# Altium PCB PCB.PcbDoc (part 2 of 2)
Units mm, origin at the board's own origin, x right, y up, seen from the top; angles counter-clockwise.
Board outline 100 x 70 mm, 4 copper layers (Top, Middle_1, Middle 2, Bot), stack 1.541 mm thick; 204 components, 143 nets, 825 pads, 208 vias.
Unrouted connection lines stored in the file: 379.
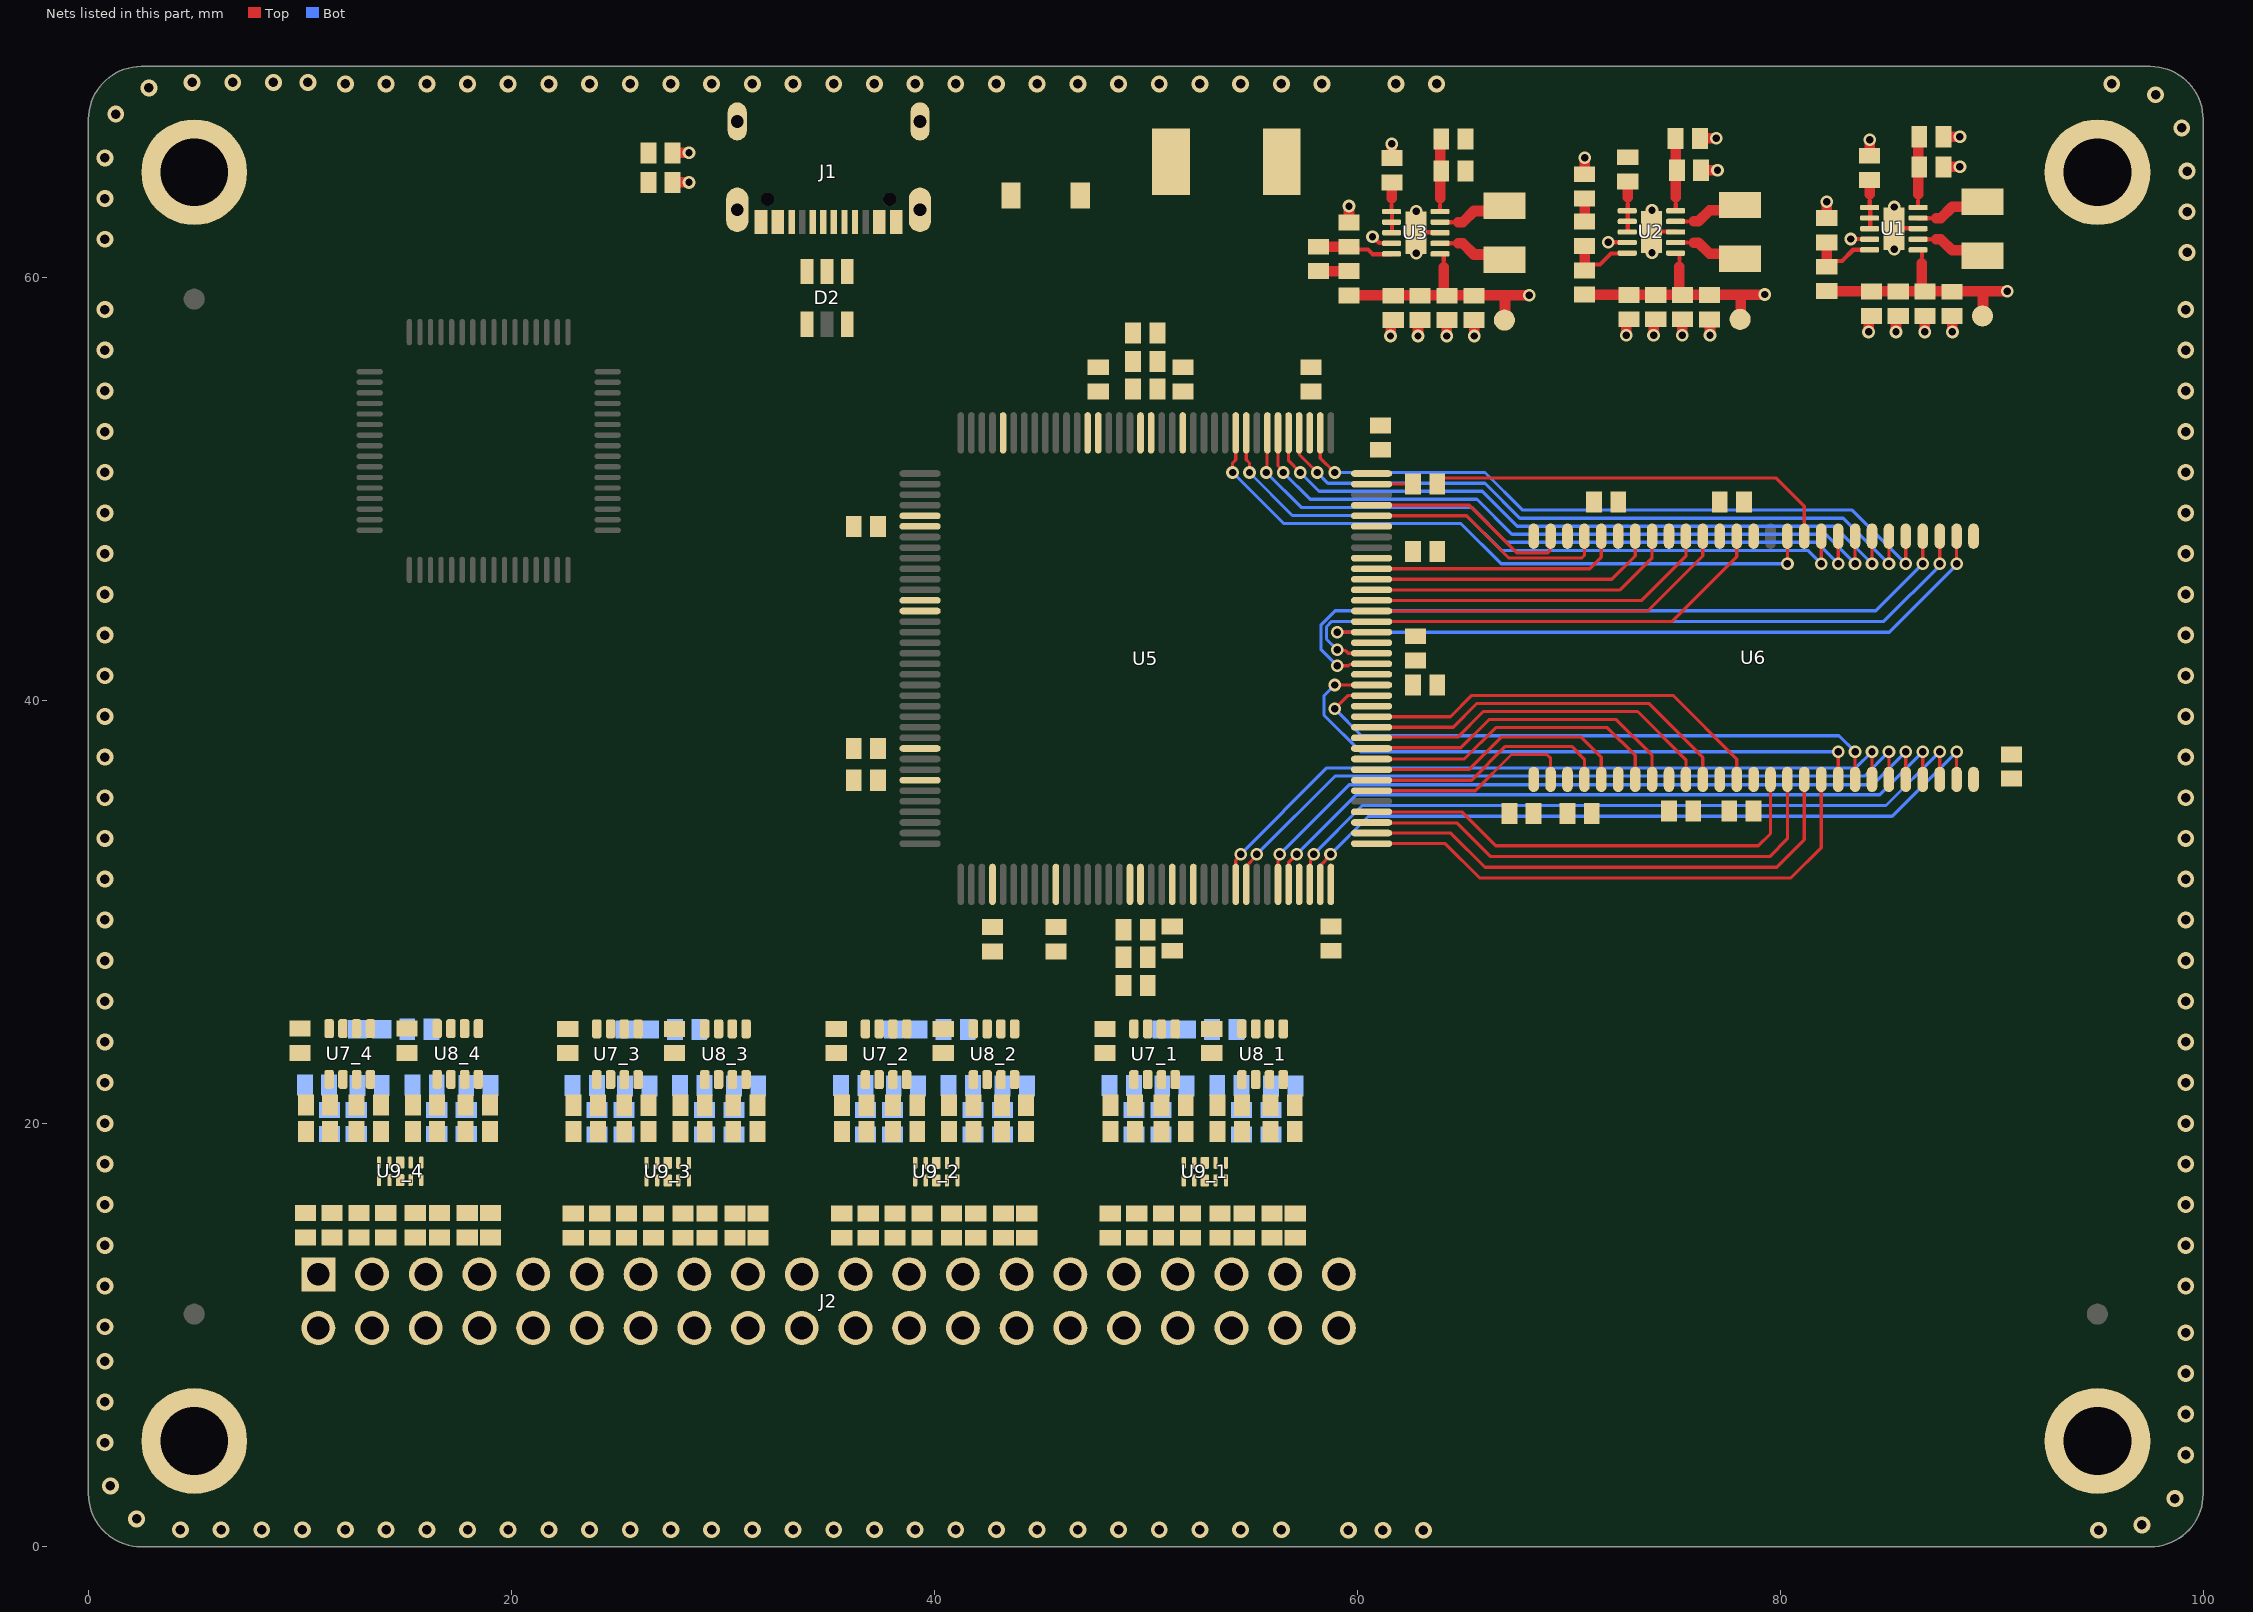
[diagram p4: the nets of this part, all layers, seen from the top]

## Part data
C1 C2 C3 C4 C5 C6 C8 C9 C10 C11 C12 C13 C15 C16 C17 C18 C19 C20 C29 C31: library part CAP-0603-4.7uF-35V-X5R, "Ceramic capacitor 4.7uF 35V X5R 0603", Supplier Part Number 1=490-7205-1-ND, Supplier 1=DigiKey
C7 C14 C21 C22 C23 C24 C25 C26 C27 C28 C30 C32 C33 C34 C35 C36 C37 C38 C39 C40 C41 C42 C43 C44 C45 C46 C48_1 C48_2 C48_3 C48_4 C60_1 C60_2 C60_3 C60_4 C61_1 C61_2 C61_3 C61_4: library part CAP-0603-100nF-50V-X7R, "Ceramic capacitor 100nF 50V X7R 0603", Supplier Part Number 1=490-5798-1-ND, Supplier 1=DigiKey
C47_1 C47_2 C47_3 C47_4 C49_1 C49_2 C49_3 C49_4 C52_1 C52_2 C52_3 C52_4 C59_1 C59_2 C59_3 C59_4: library part CAP-0603-10nF-100V-X7R, "Ceramic capacitor 10nF 100V X7R 0603", Supplier Part Number 1=490-5771-1-ND, Supplier 1=DigiKey
C50_1 C50_2 C50_3 C50_4 C51_1 C51_2 C51_3 C51_4 C53_1 C53_2 C53_3 C53_4 C54_1 C54_2 C54_3 C54_4: library part CAP-0603-10pF-100V-NP0, "Ceramic capacitor 10pF 100V NP0 0603", Supplier Part Number 1=490-4770-1-ND, Supplier 1=DigiKey
C55_1 C55_2 C55_3 C55_4 C56_1 C56_2 C56_3 C56_4 C57_1 C57_2 C57_3 C57_4 C58_1 C58_2 C58_3 C58_4: library part CAP-0603-5pF-100V-NP0, "Ceramic capacitor 5pF 100V NP0 0603", Supplier Part Number 1=490-4770-1-ND, Supplier 1=DigiKey
D1: library part DIO-SOD123W-SCHOTTKY-60V-1A, "Schottky diode 60V 1A SOD-123W", Manufacturer=Nexperia, Supplier Part Number 1=771-PMEG6010CEH-T/R, RoHS Compliant=Yes, Supplier 1=Mouser
D2: library part IC-MPN-USBLC6-2SC6Y, "IC USB ESD protection SOT-23-6", Arrow Part Number=USBLC6-2SC6Y, Manufacturer_Name=STMicroelectronics, Mouser Part Number=511-USBLC6-2SC6Y, Arrow Price/Stock=https://www.arrow.com/en/products/usblc6-2sc6y/stmicroelectronics?utm_currency=USD&region=nac, Datasheet Link=https://componentsearchengine.com/Datasheets/1/USBLC6-2SC6Y.pdf, Height=1.45mm, Manufacturer_Part_Number=USBLC6-2SC6Y, Mouser Price/Stock=https://www.mouser.co.uk/ProductDetail/STMicroelectronics/USBLC6-2SC6Y?qs=gNDSiZmRJS%2FOgDexvXkdow%3D%3D
F1: library part FUS-1812-PTC-1.1A-33V, "33V 1.1A 20A 1.95A 60mΩ 1812 PTC Resettable Fuses ROHS", Manufacturer_Name=LITTELFUSE, Manufacturer_Part_Number=1812L110/33, Mouser Part Number=N/A, Supplier Part Number 1=576-1812L110/33MR, Datasheet Link=http://www.littelfuse.com/~/media/electronics/datasheets/resettable_ptcs/littelfuse_ptc_1812l_datasheet.pdf.pdf, Height=1.25mm, Mouser Price/Stock=https://www.mouser.co.uk/ProductDetail/Littelfuse/1812L110-33?qs=skbisGc1mWUPu8SxwxrL5A%3D%3D, Supplier 1=Mouser
FB1_1 FB1_2 FB1_3 FB1_4: library part FER-0603-120R-3A, "Ferrite Bead, 0603, 75Ω @ 100MHz, 25%, 1Ω, 200mA", Case Code (Imperial)=0603, Case Code (Metric)=1608, Current Rating=3A, DC Resistance (DCR)=30mR, Inductor Type="FERRITE BEAD", Max Operating Temperature=125°C, Min Operating Temperature=-55°C, Package Quantity=4000, Test Frequency=100MHz, Tolerance=25%, Case/Package=0603, Core Material=Ferrite, Depth=0.95mm, Height=0.8mm, Impedance=120R, Lead Free="Lead Free", Length=1.6mm, Material=Ferrite, Max Current Rating=3A, Max DC Current=3A, Number of Circuits=1, Number of Lines=1, Number of Pins=2, Packaging="Tape and Reel", REACH SVHC="No SVHC", RoHS Compliant=Yes, Series=BLM18K, Termination=SMD/SMT, Width=0.8mm
J1: library part CON-MPN-12402012E212A, "USB-C 2.0 connector 24P", Package=None, Supplier Part Number 1=664-12402012E212ACT-ND, Availability="In Stock", Check_prices=https://www.snapeda.com/parts/12402012E212A/Amphenol/view-part/?ref=eda, MF="Amphenol ICC (Commercial Products)", MP=12402012E212A, Price=None, Purchase-URL=https://pricing.snapeda.com/search/part/12402012E212A/?ref=eda, SnapEDA_Link=https://www.snapeda.com/parts/12402012E212A/Amphenol/view-part/?ref=snap, Supplier 1=DigiKey
J2: library part CON-HDR-90DEG-F-2x20-2.54mm, "Female header 2x20 2.54mm THT"
L1 L2 L3: library part IND-1210-1.5uH-1.75A, "1.5 µH Shielded Drum Core, Wirewound Inductor 1.75 A 68.4mOhm Max", Supplier Part Number 1=490-5335-6-ND, Supplier 1=DigiKey
MT1 MT2 MT3 MT4: library part M3_Mounting_Hole, "Mounting Hole 5mm x 5mm for M3 screws"
R1 R2: library part RES-0603-5.1k-1%, "5.1k ±1% 0603 100mW 75V", Manufacturer=UNI-ROYAL, Part Number=0402WGF1001TCE, Supplier Part Number 1=311-5.10KHRCT-ND, Supplier 1=DigiKey
R3 R5: library part RES-0603-560k-1%, "560k ±1% 0603 100mW 75V", Manufacturer=UNI-ROYAL, Part Number=0402WGF1001TCE, Supplier Part Number 1=311-100KHRCT-ND, Supplier 1=DigiKey
R4 R7 R8 R10 R14_1 R14_2 R14_3 R14_4 R15_1 R15_2 R15_3 R15_4 R17_1 R17_2 R17_3 R17_4 R18_1 R18_2 R18_3 R18_4 R20_1 R20_2 R20_3 R20_4 R21_1 R21_2 R21_3 R21_4 R22_1 R22_2 R22_3 R22_4 R23_1 R23_2 R23_3 R23_4: library part RES-0603-100k-1%, "100k ±1% 0603 100mW 75V", Manufacturer=UNI-ROYAL, Part Number=0402WGF1001TCE, Supplier Part Number 1=311-100KHRCT-ND, Supplier 1=DigiKey
R6 R9: library part RES-0603-43.2k-1%, "43.2k ±1% 0603 100mW 75V", Manufacturer=UNI-ROYAL, Part Number=0402WGF1001TCE, Supplier Part Number 1=311-43.2KHRCT-ND, Supplier 1=DigiKey
R11: library part RES-0603-20R-1%, "20R ±1% 0603 100mW 75V", Manufacturer=UNI-ROYAL, Part Number=0402WGF1001TCE, Supplier Part Number 1=13-RC0603FR-1020RLCT-ND, Supplier 1=DigiKey
R12_1 R12_2 R12_3 R12_4 R13_1 R13_2 R13_3 R13_4 R16_1 R16_2 R16_3 R16_4 R19_1 R19_2 R19_3 R19_4 R28 R29: library part RES-0603-100R-1%, "100R ±1% 0603 100mW 75V", Manufacturer=UNI-ROYAL, Part Number=0402WGF1001TCE, Supplier Part Number 1=311-100HRCT-ND, Supplier 1=DigiKey
TP1 TP2 TP3: library part Test_Point_Pad, "Test Point Pad"
U1 U2 U3: library part IC-MPN-TPS63030, "IC buck-boost regulator 900mA TPS63030 SON-10 TPS63031", Datasheet Link=http://www.ti.com/lit/gpn/tps63031
U4: library part IC-MPN-FT2232HL, "Dual High Speed USB to Multipurpose UART / FIFO IC, 3 to 3.6 V, LQFP-64", Manufacturer=FTDI, Maximum Operating Temperature=+85°C, Minimum Operating Temperature=-40°C, Package Description="64-Pin Low-profile Quad Flat Package, Body 10 x 10 mm, Pitch 0.5 mm", Package Reference=LQFP-64, Package Type=LQFP, Datasheet URL=http://www.ftdichip.com/Support/Documents/DataSheets/ICs/DS_FT2232H.pdf, Datasheet Version="Rev. 2.5, 07/2016", Dimensions=10x10x1.4mm, Height=1.4mm, Length=10mm, Manufacturer URL=http://www.nxp.com/, Maximum Data Rate=480Mbit/s, Mounting Technology=SurfaceMount, Mounting Type=SurfaceMount, Number of Channels per Chip=2, Pin Count=64, Standard Supported=RS232,RS422,RS485, Width=10mm
U5: library part IC-MPN-ICE40HX4K-TQ144, "iCE40 HX4K Series FPGA Family, 3520 Logic Cells, 1.2 V Core, 80 K Embedded RAM Bits, TQFP-144", ComponentLink1Description="Manufacturer URL", ComponentLink1URL=http://www.latticesemi.com/en, ComponentLink2Description=Datasheet, ComponentLink2URL=http://www.latticesemi.com/~/media/Documents/DataSheets/iCE/iCE40LPHXFamilyDataSheet.pdf, ComponentLink3Description="Package Specification", ComponentLink3URL=http://www.latticesemi.com/lit/docs/package/pkg.pdf
U6: library part IC-SDRAM-256Mb-JEDEC-TSSOP2, "SDRAM Memory IC 256Mb (16M x 16) Parallel 166MHz 5ns 54-TSOP II"
U7_1 U7_2 U7_3 U7_4 U8_1 U8_2 U8_3 U8_4: library part IC-MPN-TLV3502AIDCNR, ComponentLink2Description=Datasheet, ComponentLink2URL=http://www.ti.com/lit/ds/symlink/tlv3502.pdf
U9_1 U9_2 U9_3 U9_4: library part TVS-MPN-TPD4E05U06, "14V Clamp 2.5A (8/20µs) Ipp Tvs Diode Surface Mount USON-10", ComponentLink2Description=Datasheet, ComponentLink2URL=http://www.ti.com/lit/ds/symlink/tpd4e05u06-q1.pdf

## Free pads (board coordinates)
  round 1 smd mask+0.5: 145(5,11) 145(5,59) 145(95,11)

## Via types
v1: diameter 0.8, hole 0.45, Top to Bot, tented both sides, 136 vias
v2: diameter 0.6, hole 0.35, Top to Bot, tented both sides, 72 vias

## Nets (pads, with @x,y where several pads share a name; then routed paths per layer and width w, separated by ;. In a path a pad name is that pad's centre, name@x,y a point inside that pad or via, vN(x,y) a via of type N, cw(c..) or ccw(c..) an arc to the next point about the centre after c; other vN are vias at no path point)
1V2: C15.2 C16.2 C17.2 C18.2 C42.2 C43.2 C44.2 C45.2 R8.2 R28.1 R29.1 TP3.1 U3.1 U5.27 U5.40 U5.92 U5.111 | length 11.4
  Top w0.2: 64.092,60.826 U3.1@64.092,61.132
  Top w0.5: R8.2@59.607,59.174 61.688,59.174 C18.2@61.702,59.16 ; C18.2@61.647,59.179 C16.2@64.092,59.179 ; C16.2@64.092,59.151 C16.2@64.092,59.179 ; 64.092,60.496 C16.2@64.092,59.179 ; TP3.1@66.983,58.029 66.983,59.179 ; v2(68.132,59.179) 66.983,59.179 ; C16.2@64.092,59.179 66.983,59.179
2V5: C8.2 C9.2 C10.2 C11.2 C46.2 R5.2 TP2.1 U2.1 U5.108 | length 11.4
  Top w0.2: 75.234,60.862 U2.1@75.234,61.168
  Top w0.5: R5.2@70.749,59.21 72.83,59.21 C11.2@72.844,59.196 ; C11.2@72.789,59.215 C9.2@75.234,59.215 ; C9.2@75.234,59.187 C9.2@75.234,59.215 ; 75.234,60.532 C9.2@75.234,59.215 ; TP2.1@78.125,58.065 78.125,59.215 ; v2(79.274,59.215) 78.125,59.215 ; C9.2@75.234,59.215 78.125,59.215
3V3: C1.2 C2.2 C3.2 C4.2 C22.2 C23.2 C24.2 C25.2 C26.2 C27.2 C28.2 C33.2 C34.2 C35.2 C36.2 C37.2 C38.2 C39.2 C40.2 C41.2 FB1_1.1 FB1_2.1 FB1_3.1 FB1_4.1 R3.2 TP1.1 U1.1 U5.6 U5.30 U5.46 U5.57 U5.72 U5.89 U5.100 U5.123 U5.131 U6.1 U6.3 U6.9 U6.14 U6.27 U6.43 U6.49 | length 11.4
  Top w0.2: 86.698,61.018 U1.1@86.698,61.324
  Top w0.5: R3.2@82.199,59.38 82.213,59.366 84.294,59.366 C4.2@84.308,59.352 ; C4.2@84.253,59.371 C2.2@86.698,59.371 ; C2.2@86.698,59.343 C2.2@86.698,59.371 ; 86.698,60.688 C2.2@86.698,59.371 ; TP1.1@89.589,58.221 89.589,59.371 ; v2(90.738,59.371) 89.589,59.371 ; C2.2@86.698,59.371 89.589,59.371
3V3A_1: C48_1.2 C60_1.2 C61_1.2 FB1_1.2 U7_1.8 U8_1.8
3V3A_2: C48_2.2 C60_2.2 C61_2.2 FB1_2.2 U7_2.8 U8_2.8
3V3A_3: C48_3.2 C60_3.2 C61_3.2 FB1_3.2 U7_3.8 U8_3.8
3V3A_4: C48_4.2 C60_4.2 C61_4.2 FB1_4.2 U7_4.8 U8_4.8
GND: C1.1 C2.1 C3.1 C4.1 C5.1 C6.1 C7.1 C8.1 C9.1 C10.1 C11.1 C12.1 C13.1 C14.1 C15.1 C16.1 C17.1 C18.1 C19.1 C20.1 C21.1 C22.1 C23.1 C24.1 C25.1 C26.1 C27.1 C28.1 C33.1 C34.1 C35.1 C36.1 C37.1 C38.1 C39.1 C40.1 C41.1 C42.1 C43.1 C44.1 C45.1 C46.1 C47_1.1 C47_2.1 C47_3.1 C47_4.1 C48_1.1 C48_2.1 C48_3.1 C48_4.1 C49_1.1 C49_2.1 C49_3.1 C49_4.1 C52_1.1 C52_2.1 C52_3.1 C52_4.1 C55_1.1 C55_2.1 C55_3.1 C55_4.1 C56_1.1 C56_2.1 C56_3.1 C56_4.1 C57_1.1 C57_2.1 C57_3.1 C57_4.1 C58_1.1 C58_2.1 C58_3.1 C58_4.1 C59_1.1 C59_2.1 C59_3.1 C59_4.1 C60_1.1 C60_2.1 C60_3.1 C60_4.1 C61_1.1 C61_2.1 C61_3.1 C61_4.1 D2.2 J1.A1_B12 J1.SH J2.2 J2.4 J2.6 J2.8 J2.9 J2.10 J2.12 J2.14 J2.16 J2.18 J2.19 J2.20 J2.22 J2.24 J2.26 J2.28 J2.29 J2.30 J2.32 J2.34 J2.36 J2.38 J2.39 J2.40 MT1.MT MT2.MT MT3.MT MT4.MT R1.1 R2.1 R4.1 R7.1 R10.1 R20_1.1 R20_2.1 R20_3.1 R20_4.1 R21_1.1 R21_2.1 R21_3.1 R21_4.1 R22_1.1 R22_2.1 R22_3.1 R22_4.1 R23_1.1 R23_2.1 R23_3.1 R23_4.1 U1.3 U1.9 U1.11 U2.3 U2.9 U2.11 U3.3 U3.9 U3.11 U5.5 U5.13 U5.14 U5.59 U5.69 U5.86 U5.103 U5.132 U5.140 U6.6 U6.12 U6.28 U6.41 U6.46 U6.52 U6.54 U7_1.5 U7_2.5 U7_3.5 U7_4.5 U8_1.5 U8_2.5 U8_3.5 U8_4.5 U9_1.3 U9_1.8 U9_2.3 U9_2.8 U9_3.3 U9_3.8 U9_4.3 U9_4.8 | length 24
  Top w0.2: v2(60.722,61.949) 60.741,61.949 61.039,61.652 U3.9@61.639,61.652 ; U3.11@62.792,62.16 U3.3@63.937,62.16 ; v2(71.866,61.687) 72.781,61.687 U2.9@72.789,61.696 ; U2.11@73.934,62.196 U2.3@75.079,62.196 ; v2(83.33,61.844) 84.244,61.844 U1.9@84.253,61.852 ; U1.11@85.398,62.352 U1.3@86.543,62.352
  Top w0.5: R2.1@27.626,64.516 v2(28.4,64.516) ; R1.1@27.626,65.913 v2(28.4,65.913) ; R10.1@59.607,62.624 v2(59.607,63.398) ; v2(61.572,57.255) C18.1@61.572,58.029 ; C21.1@61.626,65.669 v2(61.626,66.337) ; v2(62.869,57.255) C17.1@62.869,58.029 ; v2(64.225,57.255) C16.1@64.225,58.029 ; v2(65.536,57.255) C15.1@65.536,58.029 ; R7.1@70.749,64.905 v2(70.749,65.679) ; v2(72.714,57.291) C11.1@72.714,58.065 ; v2(74.011,57.291) C10.1@74.011,58.065 ; v2(75.367,57.291) C9.1@75.367,58.065 ; C12.1@76.205,66.602 v2(76.979,66.602) ; C13.1@76.26,65.095 v2(77.034,65.095) ; v2(76.678,57.291) C8.1@76.678,58.065 ; R4.1@82.199,62.832 v2(82.199,63.606) ; v2(84.178,57.447) C4.1@84.178,58.221 ; C7.1@84.231,65.755 v2(84.231,66.529) ; v2(85.475,57.447) C3.1@85.475,58.221 ; v2(86.831,57.447) C2.1@86.831,58.221 ; C6.1@87.724,65.251 v2(88.498,65.251) ; C5.1@87.724,66.676 v2(88.498,66.676) ; v2(88.142,57.447) C1.1@88.142,58.221
  other v1: 59.575,0.779 61.206,0.779 63.13,0.779 95.054,0.779 4.348,0.803 6.272,0.803 8.196,0.803 10.12,0.803 12.152,0.803 14.076,0.803 16,0.803 17.924,0.803 19.848,0.803 21.773,0.803 23.697,0.803 25.621,0.803 27.545,0.803 29.469,0.803 31.393,0.803 33.317,0.803 35.241,0.803 37.165,0.803 39.09,0.803 41.014,0.803 42.938,0.803 44.862,0.803 46.786,0.803 48.71,0.803 50.634,0.803 52.558,0.803 54.482,0.803 56.407,0.803 97.098,1.036 2.274,1.316 98.663,2.274 1.036,2.881 99.175,4.348 0.779,4.924 99.175,6.272 0.779,6.848 99.175,8.196 0.779,8.773 99.175,10.12 0.779,10.404 0.779,12.328 99.175,12.328 0.779,14.252 99.175,14.252 0.779,16.177 99.175,16.177 0.779,18.101 99.175,18.101 0.779,20.025 99.175,20.025 0.779,21.949 99.175,21.949 0.779,23.873 99.175,23.873 0.779,25.797 99.175,25.797 0.779,27.721 99.175,27.721 0.779,29.645 99.175,29.645 0.779,31.569 99.175,31.569 0.779,33.494 99.175,33.494 0.779,35.418 99.175,35.418 0.779,37.342 99.175,37.342 0.779,39.266 99.175,39.266 0.779,41.19 99.175,41.19 0.779,43.114 99.175,43.114 0.779,45.038 99.175,45.038 0.779,46.962 99.175,46.962 0.779,48.886 99.175,48.886 0.779,50.811 99.175,50.811 0.779,52.735 99.175,52.735 0.779,54.659 99.175,54.659 0.779,56.583 99.175,56.583 0.779,58.507 99.175,58.507 99.245,61.206 0.779,61.828 99.245,63.13 0.779,63.752 99.245,65.054 0.779,65.676 98.988,67.097 1.292,67.75 97.75,68.663 2.857,68.988 12.152,69.175 14.076,69.175 16,69.175 17.924,69.175 19.848,69.175 21.773,69.175 23.697,69.175 25.621,69.175 27.545,69.175 29.469,69.175 31.393,69.175 33.317,69.175 35.241,69.175 37.165,69.175 39.09,69.175 41.014,69.175 42.938,69.175 44.862,69.175 46.786,69.175 48.71,69.175 50.634,69.175 52.558,69.175 54.482,69.175 56.407,69.175 58.331,69.175 61.828,69.175 63.752,69.175 95.676,69.175 4.9,69.245 6.824,69.245 8.748,69.245 10.38,69.245
  other v2: 62.792,61.16 73.934,61.196 85.398,61.352 62.792,63.16 73.934,63.196 85.398,63.352
GND_PLL0: C29.1 C30.1 U5.53
GND_PLL1: C31.1 C32.1 U5.127
ICE_VCCPLL0: C29.2 C30.2 R28.2 U5.54
ICE_VCCPLL1: C31.2 C32.2 R29.2 U5.126
IN_DIV_1_1: C50_1.2 C58_1.2 R14_1.2 R23_1.2 U7_1.1 U9_1.1 U9_1.10
IN_DIV_1_2: C50_2.2 C58_2.2 R14_2.2 R23_2.2 U7_2.1 U9_2.1 U9_2.10
IN_DIV_1_3: C50_3.2 C58_3.2 R14_3.2 R23_3.2 U7_3.1 U9_3.1 U9_3.10
IN_DIV_1_4: C50_4.2 C58_4.2 R14_4.2 R23_4.2 U7_4.1 U9_4.1 U9_4.10
IN_DIV_2_1: C51_1.2 C57_1.2 R15_1.2 R22_1.2 U7_1.3 U9_1.2 U9_1.9
IN_DIV_2_2: C51_2.2 C57_2.2 R15_2.2 R22_2.2 U7_2.3 U9_2.2 U9_2.9
IN_DIV_2_3: C51_3.2 C57_3.2 R15_3.2 R22_3.2 U7_3.3 U9_3.2 U9_3.9
IN_DIV_2_4: C51_4.2 C57_4.2 R15_4.2 R22_4.2 U7_4.3 U9_4.2 U9_4.9
IN_DIV_3_1: C53_1.2 C56_1.2 R17_1.2 R21_1.2 U8_1.1 U9_1.4 U9_1.7
IN_DIV_3_2: C53_2.2 C56_2.2 R17_2.2 R21_2.2 U8_2.1 U9_2.4 U9_2.7
IN_DIV_3_3: C53_3.2 C56_3.2 R17_3.2 R21_3.2 U8_3.1 U9_3.4 U9_3.7
IN_DIV_3_4: C53_4.2 C56_4.2 R17_4.2 R21_4.2 U8_4.1 U9_4.4 U9_4.7
IN_DIV_4_1: C54_1.2 C55_1.2 R18_1.2 R20_1.2 U8_1.3 U9_1.5 U9_1.6
IN_DIV_4_2: C54_2.2 C55_2.2 R18_2.2 R20_2.2 U8_2.3 U9_2.5 U9_2.6
IN_DIV_4_3: C54_3.2 C55_3.2 R18_3.2 R20_3.2 U8_3.3 U9_3.5 U9_3.6
IN_DIV_4_4: C54_4.2 C55_4.2 R18_4.2 R20_4.2 U8_4.3 U9_4.5 U9_4.6
IN_FE_COMP_NEG1_1: C47_1.2 R12_1.2 U7_1.2
IN_FE_COMP_NEG1_2: C47_2.2 R12_2.2 U7_2.2
IN_FE_COMP_NEG1_3: C47_3.2 R12_3.2 U7_3.2
IN_FE_COMP_NEG1_4: C47_4.2 R12_4.2 U7_4.2
IN_FE_COMP_NEG2_1: C49_1.2 R13_1.2 U7_1.4
IN_FE_COMP_NEG2_2: C49_2.2 R13_2.2 U7_2.4
IN_FE_COMP_NEG2_3: C49_3.2 R13_3.2 U7_3.4
IN_FE_COMP_NEG2_4: C49_4.2 R13_4.2 U7_4.4
IN_FE_COMP_NEG3_1: C52_1.2 R16_1.2 U8_1.2
IN_FE_COMP_NEG3_2: C52_2.2 R16_2.2 U8_2.2
IN_FE_COMP_NEG3_3: C52_3.2 R16_3.2 U8_3.2
IN_FE_COMP_NEG3_4: C52_4.2 R16_4.2 U8_4.2
IN_FE_COMP_NEG4_1: C59_1.2 R19_1.2 U8_1.4
IN_FE_COMP_NEG4_2: C59_2.2 R19_2.2 U8_2.4
IN_FE_COMP_NEG4_3: C59_3.2 R19_3.2 U8_3.4
IN_FE_COMP_NEG4_4: C59_4.2 R19_4.2 U8_4.4
NetD2_4: D2.4
NetD2_6: D2.6
NetR6_2: R6.2 R7.2 | length 1.1
  Top w0.5: R6.2@70.749,62.662 R7.2@70.749,63.755
NetR8_1: R8.1 R9.1 | length 1.4
  Top w0.5: R9.1@58.17,60.324 R8.1@59.607,60.324
OUT_1_1: U7_1.7
OUT_1_2: U7_2.7
OUT_1_3: U7_3.7
OUT_1_4: U7_4.7
OUT_2_1: U7_1.6
OUT_2_2: U7_2.6
OUT_2_3: U7_3.6
OUT_2_4: U7_4.6
OUT_3_1: U8_1.7
OUT_3_2: U8_2.7
OUT_3_3: U8_3.7
OUT_3_4: U8_4.7
OUT_4_1: U8_1.6
OUT_4_2: U8_2.6
OUT_4_3: U8_3.6
OUT_4_4: U8_4.6
PROBE_1: C50_4.1 J2.1 R14_4.1
PROBE_2: C51_4.1 J2.3 R15_4.1
PROBE_3: C53_4.1 J2.5 R17_4.1
PROBE_4: C54_4.1 J2.7 R18_4.1
PROBE_5: C50_3.1 J2.11 R14_3.1
PROBE_6: C51_3.1 J2.13 R15_3.1
PROBE_7: C53_3.1 J2.15 R17_3.1
PROBE_8: C54_3.1 J2.17 R18_3.1
PROBE_9: C50_2.1 J2.21 R14_2.1
PROBE_10: C51_2.1 J2.23 R15_2.1
PROBE_11: C53_2.1 J2.25 R17_2.1
PROBE_12: C54_2.1 J2.27 R18_2.1
PROBE_13: C50_1.1 J2.31 R14_1.1
PROBE_14: C51_1.1 J2.33 R15_1.1
PROBE_15: C53_1.1 J2.35 R17_1.1
PROBE_16: C54_1.1 J2.37 R18_1.1
PSU1V2_FB: R9.2 R10.2 U3.10 | length 3.6
  Top w0.2: R10.2@59.607,61.474 59.741,61.34 60.506,61.34 60.722,61.125 61.61,61.125 U3.10@61.623,61.138
  Top w0.5: R9.2@58.17,61.474 R10.2@59.607,61.474
PSU1V2_L1: L3.1 U3.4 | length 3
  Top w0.2: U3.4@63.912,62.637 U3.4@63.913,62.638 64.449,62.636
  Top w0.5: 64.78,62.636 64.99,62.636 65.519,63.165 66.711,63.165 L3.1@66.958,63.412
PSU1V2_L2: L3.2 U3.2 | length 3
  Top w0.2: U3.2@63.913,61.638 64.449,61.638
  Top w0.5: 64.78,61.638 64.99,61.638 65.519,61.109 66.689,61.109 L3.2@66.947,60.851
PSU1V2_VINA: C21.2 U3.6 U3.7 U3.8 | length 1.9
  Top w0.2: U3.6@61.623,63.138 61.623,63.444 ; U3.8@61.647,62.16 U3.6@61.647,63.138
  Top w0.5: 61.623,63.775 C21.2@61.623,64.437
PSU2V5_FB: R5.1 R6.1 U2.10 | length 3.5
  Top w0.2: R5.1@70.749,60.36 71.024,60.635 71.478,60.635 72.003,61.16 U2.10@72.779,61.16
  Top w0.5: R5.1@70.749,60.36 R6.1@70.749,61.512
PSU2V5_L1: L2.1 U2.4 | length 3
  Top w0.2: U2.4@75.054,62.673 75.055,62.672 75.591,62.672
  Top w0.5: 75.922,62.672 76.132,62.672 76.661,63.201 77.853,63.201 L2.1@78.1,63.448
PSU2V5_L2: L2.2 U2.2 | length 3
  Top w0.2: U2.2@75.055,61.674 75.591,61.674
  Top w0.5: 75.922,61.674 76.132,61.674 76.661,61.145 77.831,61.145 L2.2@78.089,60.887
PSU2V5_VINA: C14.2 U2.6 U2.7 U2.8 | length 1.9
  Top w0.2: U2.8@72.789,62.196 72.789,63.174 72.789,63.48
  Top w0.5: 72.789,63.81 C14.2@72.789,64.473
PSU3V3_FB: R3.1 R4.2 U1.10 | length 3.5
  Top w0.2: R3.1@82.199,60.53 82.474,60.805 82.928,60.805 83.453,61.33 U1.10@84.229,61.33
  Top w0.5: R3.1@82.199,60.53 R4.2@82.199,61.682
PSU3V3_L1: L1.1 U1.4 | length 3
  Top w0.2: U1.4@86.518,62.829 86.519,62.828 87.055,62.828
  Top w0.5: 87.385,62.828 87.596,62.828 88.125,63.357 89.317,63.357 L1.1@89.565,63.605
PSU3V3_L2: L1.2 U1.2 | length 3
  Top w0.2: U1.2@86.519,61.83 87.055,61.83
  Top w0.5: 87.385,61.83 87.596,61.83 88.125,61.301 89.294,61.301 L1.2@89.553,61.043
PSU3V3_VINA: C7.2 U1.6 U1.7 U1.8 | length 1.9
  Top w0.2: U1.6@84.229,63.33 84.229,63.636 ; U1.8@84.253,62.352 U1.6@84.253,63.33
  Top w0.5: 84.229,63.967 C7.2@84.229,64.629
SDRAM_#CAS: U5.74 U6.17 | length 24.5
  Top w0.152: U5.74@60.654,33.75 64.421,33.75 66.04,32.131 79.832,32.131 81.14,33.439 U6.17@81.14,36.287
SDRAM_#CS: U5.88 U6.19 | length 29.7
  Top w0.152: v2(58.928,40.75) U5.88@60.675,40.75 ; U6.19@82.74,36.287 v2(82.74,37.592)
  Bot w0.152: v2(58.928,40.75) 58.425,40.247 58.425,39.327 60.16,37.592 v2(82.74,37.592)
SDRAM_#RAS: U5.73 U6.18 | length 25.8
  Top w0.152: U5.73@60.654,33.25 64.159,33.25 65.786,31.623 80.505,31.623 81.94,33.058 U6.18@81.94,36.287
SDRAM_#WE: U5.75 U6.16 | length 23.5
  Top w0.152: U5.75@60.654,34.223 64.729,34.223 66.313,32.639 79.502,32.639 80.34,33.477 U6.16@80.34,36.287
SDRAM_ADDR0: U5.67 U6.23 | length 34.4
  Top w0.152: U5.67@56.25,31.325 56.25,32.542 56.337,32.629 v2(56.337,32.75) ; U6.23@85.94,36.287 v2(85.94,37.592)
  Bot w0.152: v2(56.337,32.75) 59.62,36.033 84.381,36.033 v2(85.94,37.592)
SDRAM_ADDR1: U5.68 U6.24 | length 34.5
  Top w0.152: U5.68@56.75,31.325 56.761,31.336 56.761,32.374 v2(57.137,32.75) ; U6.24@86.74,36.287 v2(86.74,37.592)
  Bot w0.152: v2(57.137,32.75) 59.947,35.56 84.708,35.56 v2(86.74,37.592)
SDRAM_ADDR2: U5.70 U6.25 | length 34.4
  Top w0.152: U5.70@57.75,31.325 57.781,31.355 57.781,32.472 57.937,32.629 v2(57.937,32.75) ; U6.25@87.54,36.287 v2(87.54,37.592)
  Bot w0.152: v2(57.937,32.75) 60.239,35.052 85,35.052 v2(87.54,37.592)
SDRAM_ADDR3: U5.71 U6.26 | length 34.5
  Top w0.152: U5.71@58.25,31.325 58.25,32.185 v2(58.737,32.75) ; U6.26@88.34,36.287 v2(88.34,37.592)
  Bot w0.152: v2(58.737,32.75) 60.531,34.544 85.292,34.544 v2(88.34,37.592)
SDRAM_ADDR4: U5.93 U6.29 | length 33.6
  Top w0.152: v2(59.046,43.25) U5.93@60.675,43.25 ; v2(88.34,46.482) U6.29@88.34,47.787
  Bot w0.152: v2(59.046,43.25) 85.159,43.25 88.34,46.431 v2(88.34,46.482)
SDRAM_ADDR5: U5.91 U6.30 | length 34.6
  Top w0.152: v2(59.046,42.418) 59.087,42.377 59.447,42.377 59.574,42.25 U5.91@60.675,42.25 ; v2(87.54,46.482) U6.30@87.54,47.787
  Bot w0.152: v2(59.046,42.418) 58.543,42.921 58.543,43.5 58.801,43.758 84.905,43.758 87.54,46.393 v2(87.54,46.482)
SDRAM_ADDR6: U5.90 U6.31 | length 34.9
  Top w0.152: v2(59.046,41.66) 59.574,41.66 59.634,41.719 60.645,41.719 U5.90@60.675,41.75 ; v2(86.74,46.482) U6.31@86.74,47.787
  Bot w0.152: v2(59.046,41.66) 58.289,42.416 58.289,43.605 58.95,44.266 84.524,44.266 v2(86.74,46.482)
SDRAM_ADDR7: U5.110 U6.32 | length 32.3
  Top w0.152: U5.110@58.25,52.675 58.25,51.478 v2(58.928,50.8) ; v2(85.94,46.482) U6.32@85.94,47.787
  Bot w0.152: v2(58.928,50.8) 66.04,50.8 67.818,49.022 83.4,49.022 v2(85.94,46.482)
SDRAM_ADDR8: U5.112 U6.33 | length 32.4
  Top w0.152: U5.112@57.25,52.675 57.269,52.657 57.269,51.633 v2(58.102,50.8) ; v2(85.14,46.482) U6.33@85.14,47.787
  Bot w0.152: v2(58.102,50.8) 58.61,50.292 66.04,50.292 67.691,48.641 82.981,48.641 v2(85.14,46.482)
SDRAM_ADDR9: U5.113 U6.34 | length 32.2
  Top w0.152: U5.113@56.75,52.675 56.75,51.352 v2(57.302,50.8) ; v2(84.34,46.482) U6.34@84.34,47.787
  Bot w0.152: v2(57.302,50.8) 58.191,49.911 65.913,49.911 67.564,48.26 82.562,48.26 v2(84.34,46.482)
SDRAM_ADDR10: U5.64 U6.22 | length 34.8
  Top w0.152: U5.64@54.75,31.325 54.75,32.189 55.25,32.689 v2(55.25,32.75) ; U6.22@85.14,36.287 v2(85.14,37.592)
  Bot w0.152: v2(55.25,32.75) 58.949,36.449 83.997,36.449 v2(85.14,37.592)
SDRAM_ADDR11: U5.114 U6.35 | length 32.1
  Top w0.152: U5.114@56.25,52.675 56.25,51.113 56.502,50.861 v2(56.502,50.8) ; v2(83.54,46.482) U6.35@83.54,47.787
  Bot w0.152: v2(56.502,50.8) 57.772,49.53 65.659,49.53 67.31,47.879 82.143,47.879 v2(83.54,46.482)
SDRAM_ADDR12: U5.115 U6.36 | length 32
  Top w0.152: v2(55.702,50.8) 55.726,50.824 55.726,52.651 U5.115@55.75,52.675 ; v2(82.74,46.482) U6.36@82.74,47.787
  Bot w0.152: v2(55.702,50.8) 57.353,49.149 65.405,49.149 67.056,47.498 81.724,47.498 v2(82.74,46.482)
SDRAM_BS0: U5.87 U6.20 | length 28.8
  Top w0.152: v2(58.928,39.624) 59.554,40.25 U5.87@60.675,40.25 ; U6.20@83.54,36.287 v2(83.54,37.592)
  Bot w0.152: v2(58.928,39.624) 60.198,38.354 82.778,38.354 v2(83.54,37.592)
SDRAM_BS1: U5.63 U6.21 | length 34.7
  Top w0.152: U5.63@54.25,31.325 54.25,32.454 54.483,32.687 v2(54.483,32.75) ; U6.21@84.34,36.287 v2(84.34,37.592)
  Bot w0.152: v2(54.483,32.75) 58.563,36.83 83.578,36.83 v2(84.34,37.592)
SDRAM_CKE: U5.117 U6.37 | length 32.1
  Top w0.152: U5.117@54.75,52.675 54.75,51.402 54.902,51.25 v2(54.902,50.8) ; v2(81.94,46.482) U6.37@81.94,47.787
  Bot w0.152: v2(54.902,50.8) 56.934,48.768 65.151,48.768 66.802,47.117 81.305,47.117 v2(81.94,46.482)
SDRAM_CLK: R11.1 U5.107 | length 2
  Top w0.152: U5.107@60.675,50.25 R11.1@62.63,50.25
SDRAM_CLK_TERM: R11.2 U6.38 | length 19.5
  Top w0.152: R11.2@63.78,50.25 64.076,50.546 79.797,50.546 81.14,49.203 U6.38@81.14,47.787
SDRAM_DQ0: U5.78 U6.2 | length 10.3
  Top w0.152: U5.78@60.654,35.75 65.578,35.75 67.293,37.465 68.962,37.465 69.14,37.287 U6.2@69.14,36.287
SDRAM_DQ1: U5.79 U6.4 | length 12
  Top w0.152: U5.79@60.654,36.25 65.407,36.25 67.003,37.846 70.134,37.846 70.74,37.24 U6.4@70.74,36.287
SDRAM_DQ2: U5.80 U6.5 | length 13
  Top w0.152: U5.80@60.654,36.75 65.269,36.75 66.806,38.287 70.59,38.287 71.54,37.337 U6.5@71.54,36.287
SDRAM_DQ3: U5.81 U6.7 | length 14.8
  Top w0.152: U5.81@60.654,37.25 65.068,37.25 66.553,38.735 71.827,38.735 73.14,37.422 U6.7@73.14,36.287
SDRAM_DQ4: U5.82 U6.8 | length 15.7
  Top w0.152: U5.82@60.654,37.787 60.66,37.781 61.641,37.781 61.647,37.787 64.901,37.787 66.23,39.116 72.246,39.116 73.94,37.422 U6.8@73.94,36.287
SDRAM_DQ5: U5.83 U6.10 | length 17.3
  Top w0.152: U5.83@60.654,38.287 60.66,38.281 61.641,38.281 61.647,38.287 64.754,38.287 65.964,39.497 73.255,39.497 75.54,37.212 U6.10@75.54,36.287
SDRAM_DQ6: U5.84 U6.11 | length 18.2
  Top w0.152: U5.84@60.654,38.75 64.534,38.75 65.662,39.878 73.787,39.878 76.34,37.325 U6.11@76.34,36.287
SDRAM_DQ7: U5.85 U6.13 | length 19.9
  Top w0.152: U5.85@60.622,39.25 64.406,39.25 65.415,40.259 74.93,40.259 77.94,37.249 U6.13@77.94,36.287
SDRAM_DQ8: U5.94 U6.42 | length 19.5
  Top w0.152: U5.94@60.675,43.75 74.865,43.75 77.94,46.825 U6.42@77.94,47.787
SDRAM_DQ9: U5.95 U6.44 | length 17.7
  Top w0.152: U5.95@60.675,44.25 73.74,44.25 76.34,46.85 U6.44@76.34,47.787
SDRAM_DQ10: U5.96 U6.45 | length 16.7
  Top w0.152: U5.96@60.675,44.75 73.452,44.75 75.54,46.838 U6.45@75.54,47.787
SDRAM_DQ11: U5.97 U6.47 | length 14.9
  Top w0.152: U5.97@60.675,45.25 72.428,45.25 73.94,46.762 U6.47@73.94,47.787
SDRAM_DQ12: U5.98 U6.48 | length 13.9
  Top w0.152: U5.98@60.675,45.75 72.039,45.75 73.14,46.851 U6.48@73.14,47.787
SDRAM_DQ13: U5.99 U6.50 | length 12.1
  Top w0.152: U5.99@60.675,46.25 70.989,46.25 71.54,46.801 U6.50@71.54,47.787
SDRAM_DQ14: U5.104 U6.51 | length 11.9
  Top w0.152: U5.104@60.675,48.75 65.165,48.75 67.159,46.756 70.62,46.756 70.74,46.876 U6.51@70.74,47.787
SDRAM_DQ15: U5.105 U6.53 | length 10.1
  Top w0.152: U5.105@60.675,49.25 65.304,49.25 67.545,47.009 69.018,47.009 69.107,47.098 69.107,47.754 U6.53@69.14,47.787
SDRAM_LDQM: U5.76 U6.15 | length 22.4
  Top w0.152: U5.76@60.654,34.75 64.945,34.75 66.548,33.147 78.961,33.147 79.54,33.726 U6.15@79.54,36.287
SDRAM_UDQM: U5.118 U6.39 | length 31.3
  Top w0.152: v2(54.102,50.8) 54.102,51.25 54.25,51.398 U5.118@54.25,52.675 ; v2(80.34,46.482) U6.39@80.34,47.787
  Bot w0.152: v2(54.102,50.8) 56.515,48.387 64.897,48.387 66.802,46.482 v2(80.34,46.482)
THRESHOLD_1: R12_1.1 R13_1.1 R16_1.1 R19_1.1
THRESHOLD_2: R12_2.1 R13_2.1 R16_2.1 R19_2.1
THRESHOLD_3: R12_3.1 R13_3.1 R16_3.1 R19_3.1
THRESHOLD_4: R12_4.1 R13_4.1 R16_4.1 R19_4.1
USB1_CC1: J1.A5 R2.2
USB1_CC2: J1.B5 R1.2
USB1_D+: D2.3 J1.A6_B6
USB1_D-: D2.1 J1.A7_B7
USB1_VBUS: D1.1 J1.A4_B4
USB1_VBUS_FUSE: D1.2 F1.1
VIN_5V0: C5.2 C6.2 C12.2 C13.2 C19.2 C20.2 F1.2 U1.5 U2.5 U3.5 | length 9.2
  Top w0.2: U3.5@63.913,63.138 63.913,63.444 ; U2.5@75.055,63.174 75.055,63.48 ; U1.5@86.519,63.33 86.519,63.636
  Top w0.5: 63.913,63.775 C19.2@63.913,66.566 ; 75.055,63.81 C12.2@75.055,66.602 ; 86.519,63.967 C5.2@86.519,66.676
pads on no net: D2.5 J1. J1.A8 J1.B8 U4.1 U4.2 U4.3 U4.4 U4.5 U4.6 U4.7 U4.8 U4.9 U4.10 U4.11 U4.12 U4.13 U4.14 U4.15 U4.16 U4.17 U4.18 U4.19 U4.20 U4.21 U4.22 U4.23 U4.24 U4.25 U4.26 U4.27 U4.28 U4.29 U4.30 U4.31 U4.32 U4.33 U4.34 U4.35 U4.36 U4.37 U4.38 U4.39 U4.40 U4.41 U4.42 U4.43 U4.44 U4.45 U4.46 U4.47 U4.48 U4.49 U4.50 U4.51 U4.52 U4.53 U4.54 U4.55 U4.56 U4.57 U4.58 U4.59 U4.60 U4.61 U4.62 U4.63 U4.64 U5.1 U5.2 U5.3 U5.4 U5.7 U5.8 U5.9 U5.10 U5.11 U5.12 U5.15 U5.16 U5.17 U5.18 U5.19 U5.20 U5.21 U5.22 U5.23 U5.24 U5.25 U5.26 U5.28 U5.29 U5.31 U5.32 U5.33 U5.34 U5.35 U5.36 U5.37 U5.38 U5.39 U5.41 U5.42 U5.43 U5.44 U5.45 U5.47 U5.48 U5.49 U5.50 U5.51 U5.52 U5.55 U5.56 U5.58 U5.60 U5.61 U5.62 U5.65 U5.66 U5.77 U5.101 U5.102 U5.106 U5.109 U5.116 U5.119 U5.120 U5.121 U5.122 U5.124 U5.125 U5.128 U5.129 U5.130 U5.133 U5.134 U5.135 U5.136 U5.137 U5.138 U5.139 U5.141 U5.142 U5.143 U5.144 U6.40
copper on no net: | length 0.8
  Top w0.5: 72.768,65.599 v2(72.768,66.373)

## Polygon pours and split planes (outlines as drawn)
GND on Bot "NONET_L-01_P-001" (solid, shelved, pour order 2): 0,70 70,70 70,0 0,0
USB1_VBUS_FUSE on Top "NONET_L-01_P-001" (solid, pour order 0): 53.012,63.016 52.504,62.508 45.519,62.508 45.045,62.981 45.045,64.955 45.646,65.556 47.776,65.556 48.22,66 48.22,67.27 48.601,67.651 52.792,67.651 53.012,67.431

## Keep-outs
Top:
  circle w0.254: c95,11 r0.852
  circle w0.254: c5,11 r0.852
  circle w0.254: c5,59 r0.852

## Other copper
Top:
  region net PSU3V3_L1: 87.385,63.078 87.227,63.078 87.077,62.928 87.03,62.928 87.03,62.728 87.081,62.728 87.231,62.578 87.385,62.578
  region net PSU3V3_L2: 87.385,61.58 87.227,61.58 87.077,61.73 87.03,61.73 87.03,61.93 87.081,61.93 87.231,62.08 87.385,62.08
  region net PSU3V3_VINA: 83.979,63.967 83.979,63.809 84.129,63.659 84.129,63.611 84.329,63.611 84.329,63.662 84.479,63.812 84.479,63.967
  region net VIN_5V0: 86.269,63.967 86.269,63.809 86.419,63.659 86.419,63.611 86.619,63.611 86.619,63.662 86.769,63.812 86.769,63.967
  region net PSU2V5_L2: 75.922,61.424 75.764,61.424 75.614,61.574 75.566,61.574 75.566,61.774 75.617,61.774 75.767,61.924 75.922,61.924
  region net VIN_5V0: 63.663,63.775 63.663,63.617 63.813,63.467 63.813,63.419 64.013,63.419 64.013,63.47 64.163,63.62 64.163,63.775
  region net PSU1V2_VINA: 61.373,63.775 61.373,63.617 61.523,63.467 61.523,63.419 61.723,63.419 61.723,63.47 61.873,63.62 61.873,63.775
  region net PSU2V5_VINA: 72.539,63.81 72.539,63.652 72.689,63.502 72.689,63.455 72.889,63.455 72.889,63.506 73.039,63.656 73.039,63.81
  region net VIN_5V0: 74.805,63.81 74.805,63.652 74.955,63.502 74.955,63.455 75.155,63.455 75.155,63.506 75.305,63.656 75.305,63.81
  region net PSU1V2_L2: 64.78,61.388 64.622,61.388 64.472,61.538 64.424,61.538 64.424,61.738 64.475,61.738 64.625,61.888 64.78,61.888
  region net PSU1V2_L1: 64.78,62.886 64.622,62.886 64.472,62.736 64.424,62.736 64.424,62.536 64.475,62.536 64.625,62.386 64.78,62.386
  region net PSU2V5_L1: 75.922,62.922 75.764,62.922 75.614,62.772 75.566,62.772 75.566,62.572 75.617,62.572 75.767,62.422 75.922,62.422
  region net GND: 100.017,59.015 100.017,2.5 cw(c97.517,2.5) 97.517,0 89.032,0 89.032,1.23 90.194,1.23 ccw(c90.194,2.5) 91.464,2.5 91.464,5 cw(c95.017,5) 95.017,8.553 97.517,8.553 ccw(c97.517,9.823) 98.787,9.823 98.787,59.015
  region net GND: 0.017,10.985 0.017,67.5 cw(c2.517,67.5) 2.517,70 11.002,70 11.002,68.77 9.84,68.77 ccw(c9.84,67.5) 8.57,67.5 8.57,65 cw(c5.017,65) 5.017,61.447 2.517,61.447 ccw(c2.517,60.177) 1.247,60.177 1.247,10.985
  region net GND: 89.032,0 2.517,0 cw(c2.517,2.5) 0.017,2.5 0.017,10.985 1.247,10.985 1.247,9.823 ccw(c2.517,9.823) 2.517,8.553 5.017,8.553 cw(c5.017,5) 8.57,5 8.57,2.5 ccw(c9.84,2.5) 9.84,1.23 89.032,1.23
  region net GND: 11.002,70 97.517,70 cw(c97.517,67.5) 100.017,67.5 100.017,59.015 98.787,59.015 98.787,60.177 ccw(c97.517,60.177) 97.517,61.447 95.017,61.447 cw(c95.017,65) 91.464,65 91.464,67.5 ccw(c90.194,67.5) 90.194,68.77 11.002,68.77
  text "1" at 11.914,65.016 h3
Middle_1:
  text "2" at 13.946,65.016 h3
Middle 2:
  text "3" at 15.978,65.016 h3
Bot:
  region net GND: 100.017,59.015 100.017,2.5 cw(c97.517,2.5) 97.517,0 89.032,0 89.032,1.23 90.194,1.23 ccw(c90.194,2.5) 91.464,2.5 91.464,5 cw(c95.017,5) 95.017,8.553 97.517,8.553 ccw(c97.517,9.823) 98.787,9.823 98.787,59.015
  region net GND: 11.002,70 97.517,70 cw(c97.517,67.5) 100.017,67.5 100.017,59.015 98.787,59.015 98.787,60.177 ccw(c97.517,60.177) 97.517,61.447 95.017,61.447 cw(c95.017,65) 91.464,65 91.464,67.5 ccw(c90.194,67.5) 90.194,68.77 11.002,68.77
  region net GND: 0.017,10.985 0.017,67.5 cw(c2.517,67.5) 2.517,70 11.002,70 11.002,68.77 9.84,68.77 ccw(c9.84,67.5) 8.57,67.5 8.57,65 cw(c5.017,65) 5.017,61.447 2.517,61.447 ccw(c2.517,60.177) 1.247,60.177 1.247,10.985
  region net GND: 89.032,0 2.517,0 cw(c2.517,2.5) 0.017,2.5 0.017,10.985 1.247,10.985 1.247,9.823 ccw(c2.517,9.823) 2.517,8.553 5.017,8.553 cw(c5.017,5) 8.57,5 8.57,2.5 ccw(c9.84,2.5) 9.84,1.23 89.032,1.23
  text "4" at 18.01,65.016 h3
Multi-Layer:
  pour cut-out: 20.153,67.223 20.112,67.182 20.112,64.914 11.78,64.914 11.771,64.923 11.771,67.223

## Silkscreen, mask and mechanical layers (free items; w line width, h text height)
Top Solder:
  rectangle: 11.771,64.923 20.153,67.223
  region: 10.985,70 97.5,70 cw(c97.5,67.5) 100,67.5 100,59.015 98.77,59.015 98.77,60.177 ccw(c97.5,60.177) 97.5,61.447 95,61.447 cw(c95,65) 91.447,65 91.447,67.5 ccw(c90.177,67.5) 90.177,68.77 10.985,68.77
  region: 89.015,0 2.5,0 cw(c2.5,2.5) 0,2.5 0,10.985 1.23,10.985 1.23,9.823 ccw(c2.5,9.823) 2.5,8.553 5,8.553 cw(c5,5) 8.553,5 8.553,2.5 ccw(c9.823,2.5) 9.823,1.23 89.015,1.23
  region: 100,61.297 100,2.5 cw(c97.5,2.5) 97.5,0 89.015,0 89.015,1.23 90.177,1.23 ccw(c90.177,2.5) 91.447,2.5 91.447,5 cw(c95,5) 95,8.553 97.5,8.553 ccw(c97.5,9.823) 98.77,9.823 98.77,61.297
  region: 0,9.34 0,67.5 cw(c2.5,67.5) 2.5,70 10.985,70 10.985,68.77 9.823,68.77 ccw(c9.823,67.5) 8.553,67.5 8.553,65 cw(c5,65) 5,61.447 2.5,61.447 ccw(c2.5,60.177) 1.23,60.177 1.23,9.34
Bottom Solder:
  rectangle: 11.771,64.923 20.153,67.223
  region: 0,9.387 0,67.547 cw(c2.5,67.547) 2.5,70.047 10.985,70.047 10.985,68.817 9.823,68.817 ccw(c9.823,67.547) 8.553,67.547 8.553,65.047 cw(c5,65.047) 5,61.494 2.5,61.494 ccw(c2.5,60.224) 1.23,60.224 1.23,9.387
  region: 100,61.344 100,2.547 cw(c97.5,2.547) 97.5,0.047 89.015,0.047 89.015,1.277 90.177,1.277 ccw(c90.177,2.547) 91.447,2.547 91.447,5.047 cw(c95,5.047) 95,8.6 97.5,8.6 ccw(c97.5,9.87) 98.77,9.87 98.77,61.344
  region: 89.015,0.047 2.5,0.047 cw(c2.5,2.547) 0,2.547 0,11.032 1.23,11.032 1.23,9.87 ccw(c2.5,9.87) 2.5,8.6 5,8.6 cw(c5,5.047) 8.553,5.047 8.553,2.547 ccw(c9.823,2.547) 9.823,1.277 89.015,1.277
  region: 10.985,70.047 97.5,70.047 cw(c97.5,67.547) 100,67.547 100,59.062 98.77,59.062 98.77,60.224 ccw(c97.5,60.224) 97.5,61.494 95,61.494 cw(c95,65.047) 91.447,65.047 91.447,67.547 ccw(c90.177,67.547) 90.177,68.817 10.985,68.817
M1 Board Outline:
  the board outline again, w0.127